# EAGLE board tiny (EAGLE 9.6.2)

Size 30 x 20 mm. Coordinates in mm from the lower left corner, seen from the top.
Outline: 0,0 30,0 30,20 0,20 0,0
Copper layers used: 
Holes 3.2 mm at 3,3

## Footprints (pad centres in the part's own frame; a part is rotated, then mirrored left to right if it is on the bottom)
BTN = smd 1 x 2: 1 -2,0; 2 2,0

## Placement (x,y rotation side)
SW1  RESET  [BTN]  5,5 90 top
SW2  BOOT  [BTN]  20,15 0 bottom

## Library data of the parts
SW1 SW2 = lib

## Nets
!RESET: SW1.1
BOOT0: SW2.1
GND: SW1.2 SW2.2